# Altium PCB E77N.PcbDoc
Units mm, origin at the board's own origin, x right, y up, seen from the top; angles counter-clockwise.
Board outline 43.18 x 24.13 mm, 2 copper layers (Top Layer, Bottom Layer), stack 1.021 mm thick; 22 components, 37 nets, 134 pads, 79 vias.
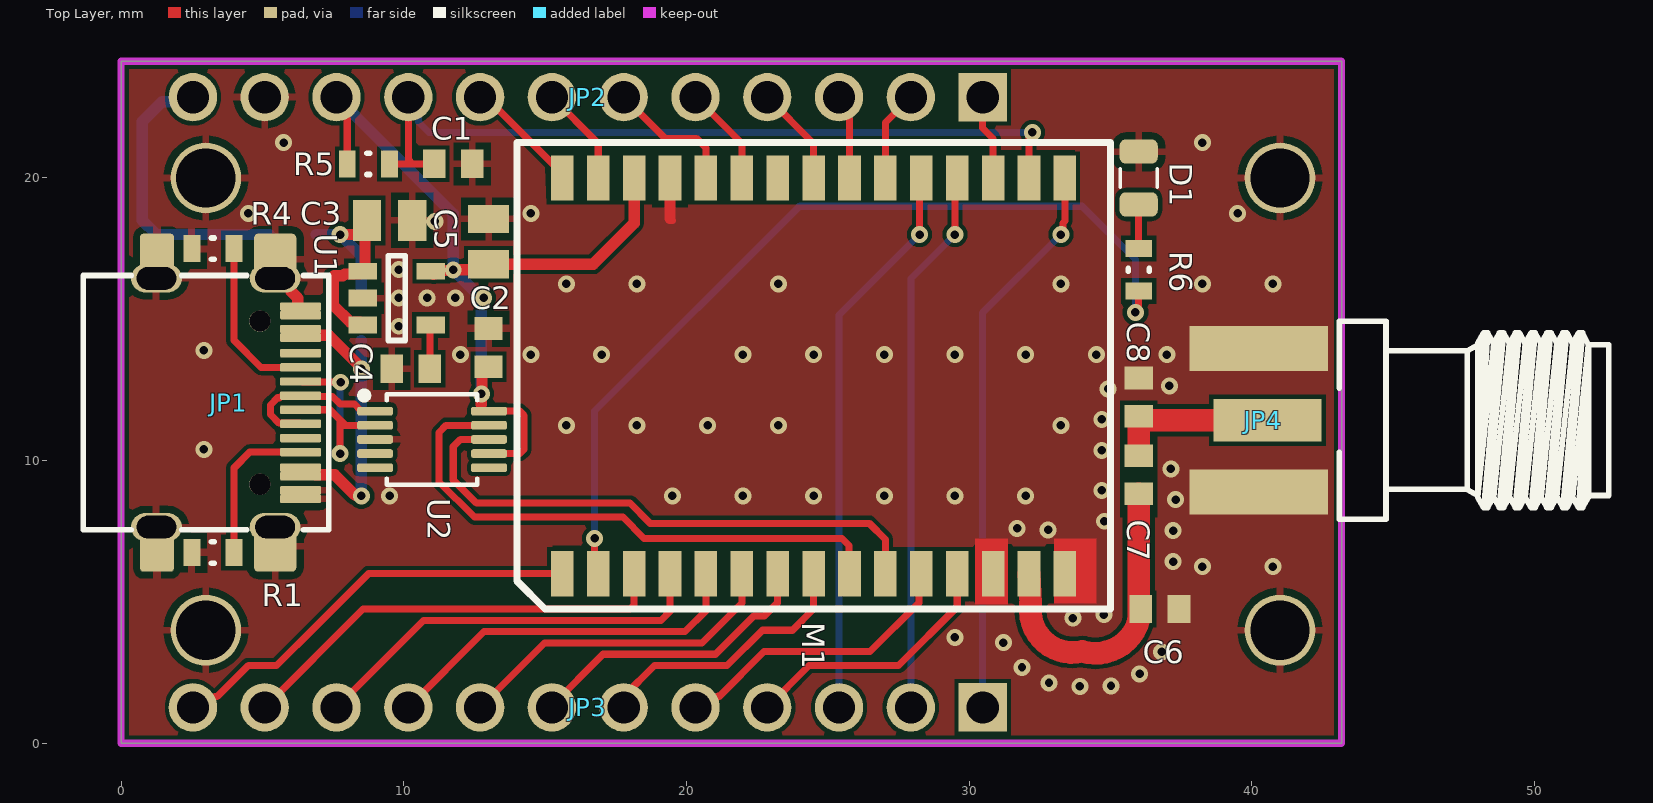
[diagram p0: Top Layer view]
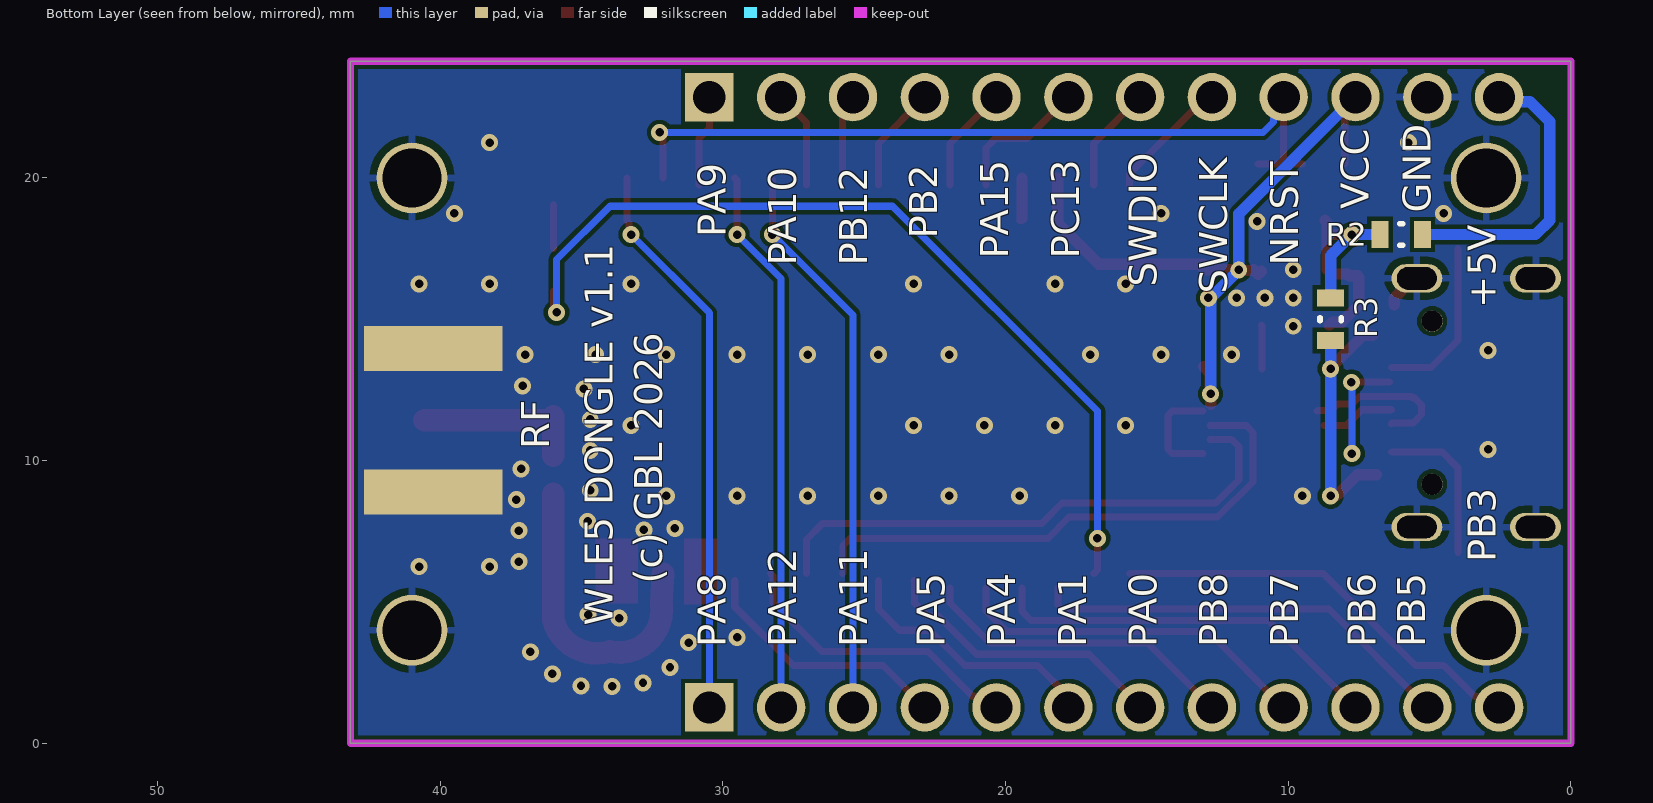
[diagram p1: Bottom Layer view, seen from below]
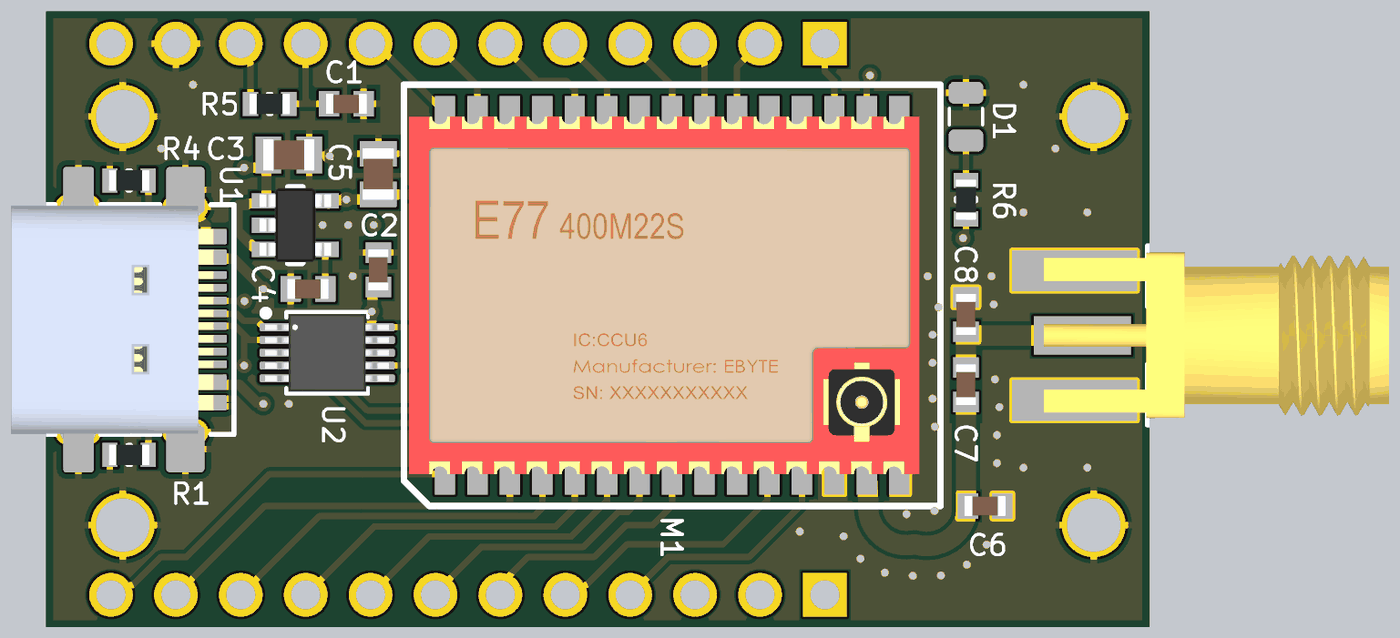
[diagram p2: 3D render of the assembled board from above, using the file's embedded part models]

## Layer stack, top to bottom
Top Solder: solder mask 0.01, Solder Resist, Dk 3.5
Top Layer: signal copper 0.0356
Dielectric 1: dielectric 0.95, FR-4, Dk 4.8
Bottom Layer: signal copper 0.0356
Bottom Solder: solder mask 0.01, Solder Resist, Dk 3.5

## Board outline
0,0 0,24.13 43.18,24.13 43.18,0

## Design rules (kind name [scope] priority, off if disabled: settings)
Clearance [All] p1: gap=0.15 ignorepadtopadclearanceinfootprint=FALSE
HoleSize [All] p1: absolutevalues=TRUE maxlimit=3 minlimit=0.025 maxpercent=80.000 minpercent=20.000
MinimumSolderMaskSliver [All] p1: minsoldermaskwidth=0.05
PolygonConnect PolygonConnect_1 [InComponent('C6') or InComponent('C8') or InComponent('JP4') vs IsNamedPolygon('GND_L01_P000') Or IsNamedPolygon('GND_L02_P001')] p1: connectstyle=Direct reliefconductorwidth=0.254 reliefentries=4 polygonreliefangle="90 Angle" airgapwidth=0.254
PolygonConnect [All] p2: thpad.connectstyle=Relief thpad.reliefconductorwidth=0.25 thpad.reliefentries=4 thpad.polygonreliefangle="90 Angle" thpad.airgapwidth=0.25 smdpad.connectstyle=Relief smdpad.reliefconductorwidth=0.25 smdpad.reliefentries=4 smdpad.polygonreliefangle="90 Angle" smdpad.airgapwidth=0.25 via.connectstyle=Direct via.reliefconductorwidth=0.254 via.reliefentries=4 via.polygonreliefangle="90 Angle" via.airgapwidth=0.254
RoutingVias [All] p1: holewidth=0.711 width=1.27 viastyle="Through Hole" minholewidth=0.711 minwidth=1.27 maxholewidth=0.711 maxwidth=1.27
SilkToSilkClearance [All] p1: silktosilkclearance=0.1
SilkToSolderMaskClearance [IsPad] p1: minsilkscreentomaskgap=0.1 clearancetoexposedcopper=TRUE
SolderMaskExpansion [All] p1: expansion=0.102 istentingtop=FALSE
SupplyNets "Schematic Supply Nets_4" [InNet('VBUS')] p1: voltage=0.000
SupplyNets "Schematic Supply Nets_3" [InNet('V_IN')] p2: voltage=0.000
SupplyNets "Schematic Supply Nets_2" [InNet('+5V')] p3: voltage=0.000
SupplyNets "Schematic Supply Nets_1" [InNet('GND')] p4: voltage=0.000
SupplyNets "Schematic Supply Nets" [InNet('VCC')] p5: voltage=0.000
Width [All] p1: maxlimit=2 minlimit=0.2 preferedwidth=0.25
26 further rules are at their usual default settings.

## Components (designator, comment, footprint, x,y, rotation, side; value= is the part's Value field where it differs from the comment)
C1 "100nF" C-0603 11.75,20.5 r180 top
C2 "100nF" C-0603 13,14 r270 top
C3 "10uF" C-0805 9.5,18.5 r0 top
C4 "nc" C-0603 10.25,13.25 r180 top
C5 "10uF" C-0805 13,17.75 r90 top
C6 "nc" C-0603 36.75,4.75 r180 top
C7 "100pF" C-0603 36,9.5 r90 top
C8 "nc" C-0603 36,12.25 r270 top
D1 "LED_1" LED_0805 36,20 r270 top
JP1 "L-KLS1-5473" USB_C_SMD_SLOT 6.35,12.05 r270 top
JP2 "HEADER 12" PLS1-12 30.48,22.86 r180 top locked
JP3 "HEADER 12" PLS1-12 30.48,1.27 r180 top locked
JP4 "EM-SA071-GGT" SMA_F_EDGE 41.825,11.43 r180 top
M1 "E77-400M22S" E77XX-M22 24.5,13 r90 top locked
R1 "4k7" R-0603 3.25,6.75 r0 top
R2 "0" R-0603 6,18 r0 bottom
R3 "nc" R-0603 8.5,15 r90 bottom
R4 "4k7" R-0603 3.25,17.5 r0 top
R5 "10k" R-0603 8.75,20.5 r180 top
R6 "470" R-0603 36,16.75 r270 top
U1 "LP5907MFX-3.0" SOT-23-5 9.75,15.75 r0 top
U2 "CH340E" MSOP-10 11,10.75 r270 top value={Value}

## Footprints (in the part's own frame and the unit in brackets; to place one, negate y for a bottom-side part, rotate by r counter-clockwise, add the part's x,y. Pads: shape width x height; smd on the part's side, far side on the other; paste and mask are expansions set on the pad)
C-0603 [mm] "Chip Capacitor, 2-Leads, Body 1,60x0,80mm, IPC Medium Density"
  rect 0.8x1 smd: 1(-0.675,0) 2(0.675,0)
  body extent -0.8,-0.4 0.8,0.4, height 0.8
C-0805 [mm] "Chip Capacitor, 2-Leads, Body 2,00x1,25mm, IPC Medium Density"
  rect 1x1.45 smd: 1(-0.8,0) 2(0.8,0)
  body extent -1,-0.62 1,0.63, height 1.25
E77XX-M22 [mm]
  rect 1.6x0.8 smd: 1(-7,8.89) 2(-7,7.62) 3(-7,6.35) 4(-7,5.08) 5(-7,3.81) 6(-7,2.54) 7(-7,1.27) 8(-7,0) 9(-7,-1.27) 10(-7,-2.54) 11(-7,-3.81) 12(-7,-5.08) 13(-7,-6.35) 14(-7,-7.62) 15(-7,-8.89) 16(7,-8.89) 17(7,-7.62) 18(7,-6.35) 19(7,-5.08) 20(7,-3.81) 21(7,-2.54) 22(7,-1.27) 23(7,0) 24(7,1.27) 25(7,2.54) 26(7,3.81) 27(7,5.08) 28(7,6.35) 29(7,7.62) 30(7,8.89)
  silkscreen extent -8.25,-10.5 8.25,10.5, body extent -7,-9.68 7,10.3, height 2.7
LED_0805 [mm] "LED, Chip; 2.00 mm L X 1.25 mm W X 0.80 mm H body"
  rrect51% 0.86x1.35 smd: A(0.935,0) K(-0.935,0)
  silkscreen extent -0.33,-0.65 0.33,0.65, body extent -1,-0.63 1,0.63, height 0.25
MSOP-10 [mm] "Small Outline Pkg (SOP), 0.50 mm pitch; 10 pin, 3.00 mm L X 3.00 mm W X 1.10 mm H body"
  rrect52% 0.31x1.27 smd: 1(-1,-2.015) 2(-0.5,-2.015) 3(0,-2.015) 4(0.5,-2.015) 5(1,-2.015) 6(1,2.015) 7(0.5,2.015) 8(0,2.015) 9(-0.5,2.015) 10(-1,2.015)
  silkscreen extent -1.68,-2.52 1.6,1.6, body extent -1.5,-2.42 1.5,2.42, height 1.1
PLS1-12 [mm] "Header, Vertical, 2.54 mm pitch; 0.70 mm lead width, 10 pins, 1 row, 10 pins per row, 24.13 mm L X 2.54 mm W X 7.54 mm H body"
  rect 1.71x1.71 hole 1.14 paste-2539.97: 1(0,0)
  round 1.71 hole 1.14 paste-2539.97: 2(2.54,0) 3(5.08,0) 4(7.62,0) 5(10.16,0) 6(12.7,0) 7(15.24,0) 8(17.78,0) 9(20.32,0) 10(22.86,0) 11(25.4,0) 12(27.94,0)
R-0603 [mm] "Chip Resistor, 2-Leads, Body 1,60x0,82mm, IPC Medium Density"
  rect 0.6x0.95 smd: 1(-0.75,0) 2(0.75,0)
  silkscreen extent -0.05,-0.38 0.05,0.38, body extent -0.8,-0.4 0.8,0.4, height 0.45
SMA_F_EDGE [mm] "SMA End Launch Jack for 1.58mm PCB, 50 Ohm, Flat Tab Contact"
  rect 3.81x1.5 smd: 1(1.27,0)
  rect 4.9x1.6 smd: 2(1.575,2.54) 2(1.575,-2.54)
  rect 4.9x1.6 smd far side: 2(1.575,2.54) 2(1.575,-2.54)
  silkscreen extent -10.81,-3.5 -1.28,3.5, body extent -10.73,-3.25 2.77,3.25, height 3.7
SOT-23-5 [mm] "SOT23, 5-Leads, Body 2,90x2,45mm, Pitch 0,95mm, IPC Medium Density"
  rect 1x0.6 smd: 1(-1.2,0.95) 2(-1.2,0) 3(-1.2,-0.95) 4(1.2,-0.95) 5(1.2,0.95)
  silkscreen extent -0.3,-1.5 0.3,1.5, body extent -1.4,-1.45 1.4,1.45, height 1.55
USB_C_SMD_SLOT [mm] "USB 3.1 Type C"
  rrect20% 1.8x1.5 smd mask+0.07: 1(-5.08,-0.9) 1(5.08,-0.9)
  rrect20% 1.8x1.2 smd mask+0.07: 1(-5.08,-5.08) 1(5.08,-5.08)
  oval 1x1.8 hole 0.8 slot 1.4 at 90 deg: 1(-4.4,-0.9) 1(-4.4,-5.1) 1(4.4,-0.9) 1(4.4,-5.1)
  rrect30% 0.3x1.45 smd paste-2 mask+0.07: A1(-3.1,0) A4(-2.6,0) A9(2.6,0) A12(3.4,0) B1(3.1,0) B4(2.3,0) B9(-2.3,0) B12(-3.4,0)
  rrect30% 0.3x1.45 smd mask+0.07: A5(-1.25,0) A6(-0.25,0) A7(0.25,0) A8(1.25,0) B5(1.75,0) B6(0.75,0) B7(-0.75,0) B8(-1.75,0)
  round 0.75 hole 0.75 unplated paste-2539.97 mask+0.07: MH(-2.885,-1.44) MH(2.885,-1.44)
  silkscreen extent -4.5,-7.69 4.5,1, body extent -4.47,-7.7 4.47,0.2, height 3.2

## Part data
C1 C2 C3 C4 C5 C6 C7 C8: library part CAPN, Voltage=50V, Вид=Конденсатор, Точність/група=NP0
JP4: library part SMA, "SMA Female R/A PCB Mount", Вид=Роз'єм
R1 R2 R3 R4 R5 R6: library part RES, Вид=Резистор, Точність/група=5%
U1: library part LP5907, "250mA Low-Dropout Regulator", Вид=Мікросхема
D1: Вид=Світлодіод
JP1 U2: Mounting  Method=SMD
JP2 JP3: Вид=Роз'єм

## Free pads (board coordinates)
  round 2.5 hole 2.1: 1(3,4) 1(3,20) 1(41,4) 1(41,20)

## Via types
v1: diameter 0.6, hole 0.3, Top Layer to Bottom Layer, tented both sides, 79 vias

## Nets (pads, with @x,y where several pads share a name; then routed paths per layer and width w, separated by ;. In a path a pad name is that pad's centre, name@x,y a point inside that pad or via, vN(x,y) a via of type N, cw(c..) or ccw(c..) an arc to the next point about the centre after c; other vN are vias at no path point)
+5V: JP2.12 R2.1 | length 10.4
  Bottom Layer w0.4: JP2.12 2.376,22.696 1.446,22.696 0.75,22 0.75,18.5 1.25,18 R2.1
DN: JP1.A7 JP1.B7 U2.2 | length 7.7
  Top Layer w0.25: JP1.A7 7.384,11.8 7.75,11.434 ; JP1.B7@6.425,12.775 6.436,12.786 7.749,12.786 v1(7.763,12.773) ; v1(7.75,10.25) 7.75,11.434 ; 7.896,11.25 7.934,11.25 ; U2.2@8.735,11.25 7.934,11.25 ; 7.75,11.434 7.934,11.25
  Bottom Layer w0.25: v1(7.75,10.25) 7.75,12.76 v1(7.763,12.773)
DP: JP1.A6 JP1.B6 U2.1 | length 5.6
  Top Layer w0.25: JP1.B6 6.325,11.325 5.587,11.325 5.279,11.634 5.279,11.966 5.537,12.225 5.604,12.225 5.654,12.275 6.35,12.275 7.475,12.275 7.75,12 8.255,12 8.475,11.78 8.955,11.78 U2.1
GND: C1.1 C2.1 C3.2 C4.2 C5.2 C6.1 C8.1 D1.K JP1.1 JP1.A1 JP1.A12 JP1.B1 JP1.B12 JP2.11 JP4.2 M1.13 M1.15 M1.27 pad.1 R1.1 R4.1 U1.2 U2.3 | length 2.1
  Top Layer w0.25: 19.42,18.58 19.5,18.5
  Top Layer w0.4: JP1.1@6,16 6.25,15.75 JP1.B12@6.25,15.516 ; 19.42,18.58 M1.27
  other v1: 33.92,2.018 35.02,2.029 32.827,2.139 36.035,2.454 31.872,2.684 36.809,3.235 31.211,3.563 29.5,3.75 33.675,4.431 34.768,4.555 38.25,6.25 40.75,6.25 37.215,6.428 37.215,7.528 32.799,7.55 31.701,7.604 34.785,7.855 37.307,8.624 9.5,8.75 19.5,8.75 22,8.75 24.5,8.75 27,8.75 29.5,8.75 32,8.75 34.693,8.951 37.136,9.711 34.693,10.359 2.925,10.4 15.75,11.25 18.25,11.25 20.75,11.25 23.25,11.25 33.25,11.25 34.693,11.459 34.922,12.535 37.084,12.645 12,13.75 14.5,13.75 17,13.75 22,13.75 24.5,13.75 27,13.75 29.5,13.75 32,13.75 34.5,13.75 37,13.75 2.925,13.9 9.822,14.755 9.822,15.755 10.822,15.755 11.822,15.755 15.75,16.25 18.25,16.25 23.25,16.25 33.25,16.25 38.25,16.25 40.75,16.25 9.822,16.755 11.1,18.461 4.5,18.75 14.5,18.75 39.5,18.75 5.75,21.25 38.25,21.25
LED: M1.2 R6.2 | length 31.3
  Top Layer w0.25: v1(16.75,7.25) 16.75,6.13 M1.2 ; v1@36,15.25 R6.2
  Bottom Layer w0.25: v1(16.75,7.25) 16.75,11.75 24,19 34,19 35.886,17.114 v1(35.886,15.243)
NetC4_1: C4.1 U1.4 | length 1.6
  Top Layer w0.25: C4.1 10.925,14.775 U1.4
NetC6_2: C6.2 C7.1 M1.14 | length 11.3
  Top Layer w0.25: 33.825,3.075 34,3.25
  Top Layer w0.8: M1.14@32.12,5.955 M1.14@32.122,5.968 ; M1.14 32.174,4.956 cw(c31.375,4.914) 32.172,4.846 ccw(c33.667,4.713) 34,3.25 ccw(c34.459,4.791) 35.935,4.152 ccw(c35.2,4.468) 36,4.468 36,4.75 C7.1
NetC7_2: C7.2 C8.2 JP4.1 | length 6
  Top Layer w0.25: C8.2 C8.2@36.145,11.43
  Top Layer w0.8: C7.2 C8.2 ; C8.2@36.145,11.43 JP4.1
NetD1_A: D1.A R6.1 | length 1.6
  Top Layer w0.25: R6.1 D1.A
NetJP1_A5: JP1.A5 R4.2 | length 6
  Top Layer w0.25: R4.2 4,14.25 4.95,13.3 JP1.A5
NetJP1_B5: JP1.B5 R1.2 | length 5.6
  Top Layer w0.25: R1.2 4,9.75 4.55,10.3 JP1.B5
NRST: C1.2 JP2.9 M1.17 R5.1 | length 28.7
  Top Layer w0.25: R5.1 10.306,20.5 ; JP2.9 10.16,20.646 10.306,20.5 ; C1.2 10.306,20.5 ; M1.17 32.12,21.62 v1@32.25,21.75
  Bottom Layer w0.25: JP2.9 10.16,22.465 10.525,22.1 10.525,21.985 10.896,21.614 v1(32.243,21.614)
PA0: JP3.7 M1.7 | length 10.3
  Top Layer w0.25: JP3.7 15.24,1.34 17.05,3.15 21.031,3.15 22.392,4.511 22.761,4.511 23.221,4.971 23.221,5.741 M1.7@23.23,5.75
PA1: JP3.6 M1.8 | length 9.4
  Top Layer w0.25: JP3.6 17.78,1.665 18.865,2.75 21.438,2.75 22.688,4 23.75,4 24.5,4.75 M1.8@24.5,5.75
PA4: JP3.5 M1.11 | length 10.5
  Top Layer w0.25: JP3.5 20.715,1.27 21.11,1.665 21.165,1.665 22.75,3.25 26.5,3.25 28.221,4.971 28.221,5.911 M1.11
PA5: JP3.4 M1.12 | length 9.1
  Top Layer w0.25: JP3.4 24.34,2.75 27.5,2.75 29.58,4.83 M1.12@29.58,5.75
PA8: JP3.1 M1.16 | length 19.9
  Top Layer w0.25: v1(33.25,18) 33.317,18.067 33.317,18.412 33.39,18.485 M1.16
  Bottom Layer w0.25: JP3.1 30.48,15.23 v1(33.25,18)
PA9: JP2.1 M1.18 | length 3.3
  Top Layer w0.25: JP2.1 30.48,21.77 30.85,21.4 M1.18@30.85,19.75
PA10: JP2.2 M1.21 | length 3.5
  Top Layer w0.25: M1.21@27.04,19.75 27.04,21.96 JP2.2
PA11: JP3.3 M1.20 | length 19.9
  Top Layer w0.25: v1(28.25,18) 28.25,19.94 M1.20
  Bottom Layer w0.25: JP3.3 25.4,15.15 v1(28.25,18)
PA12: JP3.2 M1.19 | length 19.4
  Top Layer w0.25: v1(29.5,18) 29.5,19.92 M1.19
  Bottom Layer w0.25: JP3.2 27.94,16.44 v1(29.5,18)
PA15: JP2.5 M1.25 | length 3.8
  Top Layer w0.25: JP2.5 21.96,21.22 M1.25@21.96,19.75
PB2: JP2.4 M1.23 | length 3.8
  Top Layer w0.25: JP2.4 24.5,21.22 M1.23@24.5,19.75
PB3: JP3.12 M1.1 | length 15
  Top Layer w0.25: JP3.12 2.935,1.27 3.315,1.65 3.4,1.65 4.5,2.75 5.5,2.75 6.903,4.153 8.75,6 M1.1
PB5: JP3.11 M1.3 | length 15.2
  Top Layer w0.25: JP3.11 8.56,4.75 18.004,4.75 18.15,4.896 M1.3@18.15,5.5
PB6: JP3.10 M1.4 | length 14
  Top Layer w0.25: JP3.10 10.7,4.35 19.1,4.35 19.42,4.67 M1.4@19.42,5.5
PB7: JP3.9 M1.5 | length 12.8
  Top Layer w0.25: JP3.9 12.84,3.95 19.95,3.95 20.69,4.69 M1.5@20.69,5.5
PB8: JP3.8 M1.6 | length 11.3
  Top Layer w0.25: JP3.8 14.98,3.55 20.55,3.55 21.96,4.96 M1.6@21.96,5.5
PB12: JP2.3 M1.22 | length 2.9
  Top Layer w0.25: JP2.3 25.4,22.465 25.77,22.095 M1.22@25.77,20.15
PC13: JP2.6 M1.26 | length 5
  Top Layer w0.25: JP2.6 19.236,21.404 20.346,21.404 20.69,21.06 M1.26@20.69,19.75
RXD1: M1.10 U2.8 | length 19.7
  Top Layer w0.25: U2.8@12.765,10.75 12,10.75 11.75,10.5 11.75,9.316 12.566,8.5 18,8.5 18.717,7.783 26.467,7.783 27.04,7.21 M1.10
SWCLK: JP2.8 M1.30 | length 4.4
  Top Layer w0.25: JP2.8 12.9,22.86 15.61,20.15 M1.30@15.61,19.75
SWDIO: JP2.7 M1.29 | length 3.8
  Top Layer w0.25: JP2.7 16.88,21.22 M1.29@16.88,19.75
TXD1: M1.9 U2.9 | length 19.8
  Top Layer w0.25: U2.9@12.765,11.25 11.5,11.25 11.25,11 11.25,9.25 12.5,8 17.75,8 18.5,7.25 25.5,7.25 25.75,7 25.75,6.02 M1.9
V_IN: C3.1 R2.2 R3.2 U1.1 U1.3 | length 9.5
  Top Layer w0.4: v1(7.75,18) C3.1@8.625,18 ; U1.3 8.45,14.9 8.105,14.9 7.5,15.505 7.5,16.5 7.538,16.538 7.842,16.538 7.904,16.6 8.45,16.6 U1.1 ; U1.1@8.625,16.775 C3.1@8.625,18 ; C3.1 8.625,18.425 C3.1@8.625,18
  Bottom Layer w0.4: R2.2@6.9,18 v1(7.75,18) 8.5,17.25 R3.2
VBUS: JP1.A4 JP1.A9 JP1.B4 JP1.B9 R3.1 | length 9.4
  Top Layer w0.4: JP1.A9@6.875,9.5 7.554,9.5 8.266,8.788 8.462,8.788 v1(8.5,8.75) ; JP1.B9@7.002,14.432 7.35,14.432 8.5,13.282 v1(8.5,13.25)
  Bottom Layer w0.4: v1(8.5,8.75) 8.5,10.6 v1(8.5,13.25) R3.1
VCC: C2.2 C5.1 JP2.10 M1.28 R5.2 U1.5 U2.7 U2.10 | length 29.9
  Top Layer w0.25: JP2.10 7.62,22.465 8,22.085 8,21.984 R5.2 ; U2.7 14.104,10.25 14.25,10.396 14.25,11.604 14.104,11.75 U2.10
  Top Layer w0.4: U1.5 11.059,16.591 11.219,16.75 11.244,16.725 11.725,16.725 v1(11.75,16.75) C5.1@13,16.75 ; 12.743,12 v1(12.743,12.364) ; v1@12.765,12.364 12.765,13.09 C2.2 ; C5.1 16.7,16.95 18.15,18.4 M1.28
  Bottom Layer w0.4: JP2.10 11.75,18.73 v1(11.75,16.75) 12.743,15.757 v1(12.743,12.364)
  other v1: 12.822,15.755
pads on no net: JP1.A8 JP1.B8 JP1.MH M1.24 U2.4 U2.5 U2.6

## Polygon pours and split planes (outlines as drawn)
GND on Bottom Layer "GND_L02_P001" (solid, remove dead copper, pour order 1): 0,0 0,24 43.25,24 43.25,0
GND on Top Layer "GND_L01_P000" (solid, remove dead copper, pour order 0): 0,0 0,24 43.25,24 43.25,0

## Keep-outs
Keep-Out Layer:
  the board outline again, w0.254

## Other copper
Top Layer:
  rectangle net GND: 33,4.95 34.5,7.25
  rectangle net GND: 30.2,4.914 31.375,7.25
  pour cut-out: 35.35,11.43 35.35,8 36.65,8 36.65,11.43
  pour cut-out: 15.25,7 15.25,5 30,5 30,6.875 30.075,6.95
  pour cut-out: 14.965,21 33.75,21 33.75,19.13 33.67,19.05 15.034,19.05

## Silkscreen, mask and mechanical layers (free items; w line width, h text height)
Bottom Overlay:
  text "VCC" at 7.15,18.9 h1 r270
  text "GND" at 4.95,18.775 h1 r270
  text "PA9" at 29.9,17.9 h1 r270
  text "PB2" at 22.41,17.854 h1 r270
  text "PC13" at 17.4,17.15 h1 r270
  text "PA15" at 19.9,17.15 h1 r270
  text "NRST" at 9.65,16.9 h1 r270
  text "PB12" at 24.9,16.9 h1 r270
  text "PA10" at 27.4,16.9 h1 r270
  text "SWDIO" at 14.65,16.15 h1 r270
  text "SWCLK" at 12.15,15.9 h1 r270
  text "+5V" at 2.65,15.4 h1 r270
  text "RF" at 36.15,10.4 h1 r270
  text "PB3" at 2.65,6.4 h1 r270
  text "(c) GBL 2026" at 32.15,5.65 h1 r270
  text "WLE5 DONGLE v1.1" at 33.9,4.15 h1 r270
  text "PB5" at 5.15,3.4 h1 r270
  text "PB6" at 6.9,3.4 h1 r270
  text "PB7" at 9.65,3.4 h1 r270
  text "PB8" at 12.15,3.4 h1 r270
  text "PA0" at 14.65,3.4 h1 r270
  text "PA1" at 17.15,3.4 h1 r270
  text "PA4" at 19.65,3.4 h1 r270
  text "PA5" at 22.15,3.4 h1 r270
  text "PA11" at 24.9,3.4 h1 r270
  text "PA12" at 27.4,3.4 h1 r270
  text "PA8" at 29.9,3.4 h1 r270

## Dimensions
0,0 to 0,24.13 on Mechanical 1
0,0 to 43.18,0 on Mechanical 1